# Altium PCB PCB1.PcbDoc
Units mm, origin at the board's own origin, x right, y up, seen from the top; angles counter-clockwise.
Board outline 16 x 23 mm, 2 copper layers (Top Layer, Bottom Layer); 6 components, 5 nets, 23 pads, 0 vias.
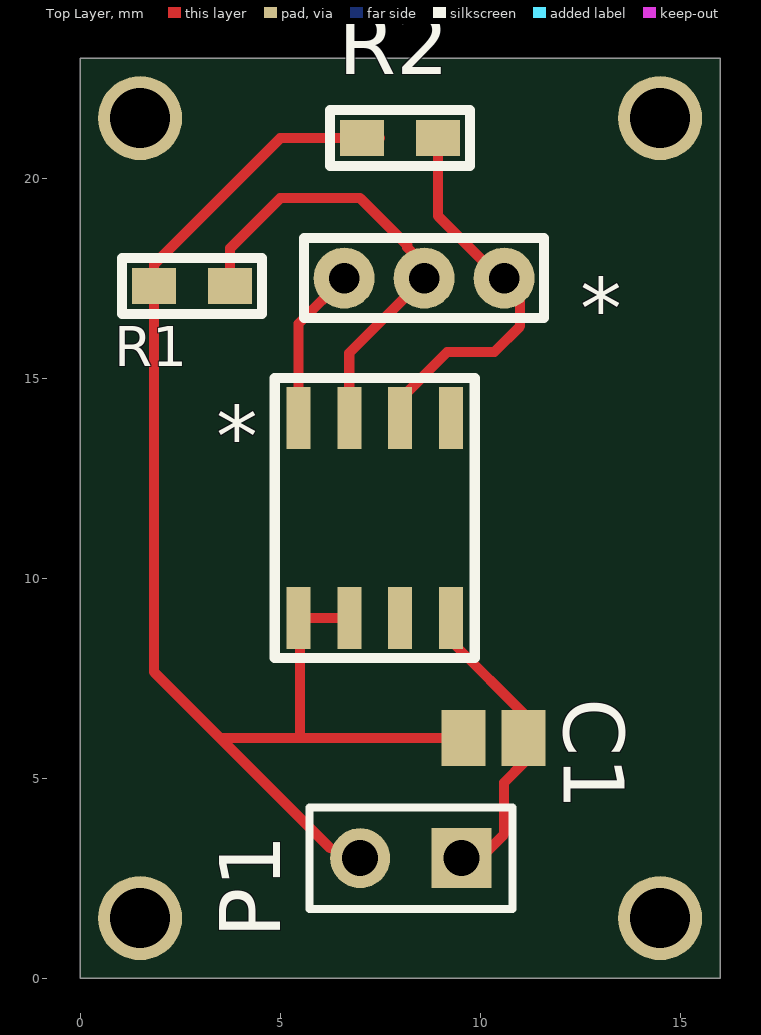
[diagram p0: Top Layer view]
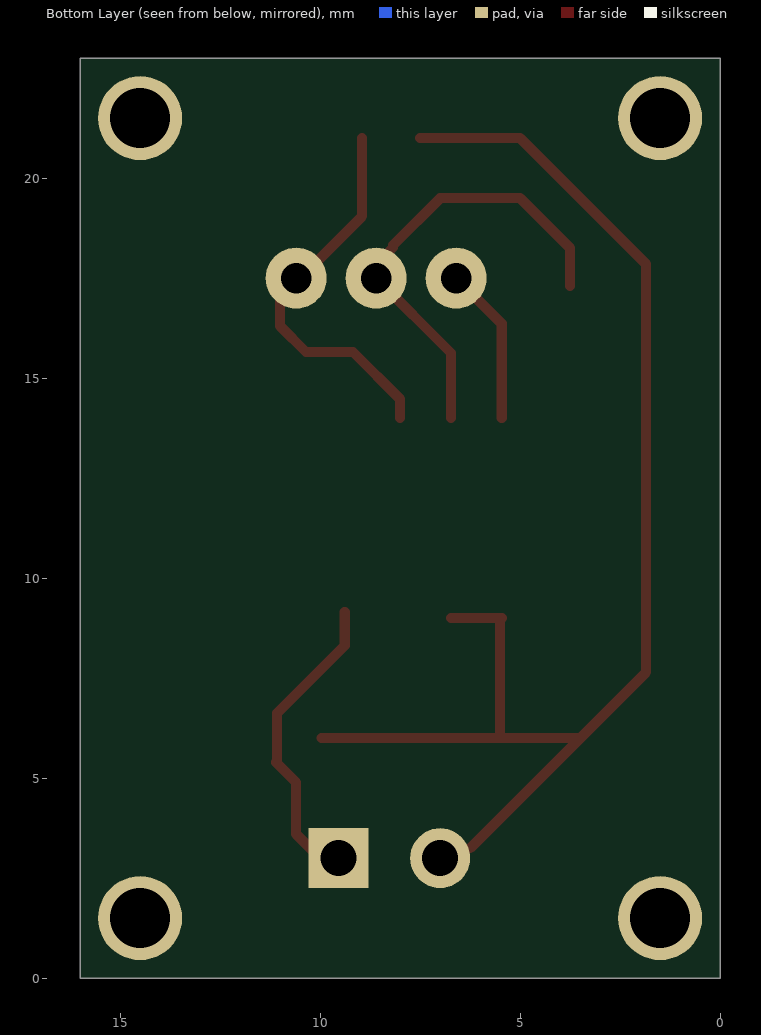
[diagram p1: Bottom Layer view, seen from below]

## Layer stack, top to bottom
Top Solder: solder mask 0.0102, Solder Resist, Dk 3.5
Top Layer: signal copper 0.0356
Dielectric 1: dielectric 0.32, FR-4, Dk 4.8
Bottom Layer: signal copper 0.0356
Bottom Solder: solder mask 0.0102, Solder Resist, Dk 3.5

## Board outline
0,0 0,23 16,23 16,0

## Design rules (kind name [scope] priority, off if disabled: settings)
Clearance [All] p1: gap=0.254 ignorepadtopadclearanceinfootprint=FALSE except(0: Arc-Hole Track-Hole SMDPad-Hole THPad-Hole Via-Hole Fill-Hole Poly-Hole Region-Hole Text-Hole; 0.3: Arc-Arc Arc-Track Track-Track)
PolygonConnect [All] p1: connectstyle=Relief reliefconductorwidth=0.254 reliefentries=4 polygonreliefangle="90 Angle" airgapwidth=0.254
RoutingVias [All] p1: holewidth=0.711 width=1.27 viastyle="Through Hole" minholewidth=0.711 minwidth=1.27 maxholewidth=0.711 maxwidth=1.27
SolderMaskExpansion [All] p1: expansion=0.102
Width [All] p1: maxlimit=1 minlimit=0.254 preferedwidth=0.254 bottomlayer_maxwidth=0.254 minimp=50.000000 maximp=50.000000 favimp=50.000000
30 further rules are at their usual default settings.

## Classes and differential pairs
component class Sheet1: * C1 P1 R1 R2

## Components (designator, comment, footprint, x,y, rotation, side; value= is the part's Value field where it differs from the comment)
* "AS5600" AS5600 5.46,9 r0 top
* "Connector 3H 2mm" "Connector 3H 2mm" 6.6,17.5 r0 top
C1 "Cap Pol3" C0805 10.335,6 r0 top value=100nF
P1 "Header 2" HDR1X2 9.54,3 r180 top
R1 "Res 2012" RES2012 2.8,17.3 r180 top
R2 "Res 2012" RES2012 8,21 r180 top

## Footprints (in the part's own frame and the unit in brackets; to place one, negate y for a bottom-side part, rotate by r counter-clockwise, add the part's x,y. Pads: shape width x height; smd on the part's side, far side on the other; paste and mask are expansions set on the pad)
AS5600 [mm]
  rect 0.6x1.55 smd: 1(0,0) 2(1.27,0) 3(2.54,0) 4(3.81,0) 5(0,5) 6(1.27,5) 7(2.54,5) 8(3.81,5)
  silkscreen extent -0.6,-1 4.41,6
C0805 [mm] "Chip Capacitor, Body 2.0x1.3mm, IPC High Density"
  rect 1.1x1.4 smd: 1(-0.75,0) 2(0.75,0)
  body extent -1.1,-0.72 1.1,0.72, height 1.4
"Connector 3H 2mm" [mil]
  round 60 hole 30: 1(0,0) 2(78.74,0) 3(157.48,0)
  silkscreen extent -39,-39 197,39
HDR1X2 [mm] "Connector; Header; 2 Position"
  rect 1.5x1.5 hole 0.9: 1(0,0)
  round 1.5 hole 0.9: 2(2.54,0)
  silkscreen extent -1.27,-1.27 3.81,1.27
RES2012 [mm]
  rect 1.1x0.9 smd: 1(-0.95,0) 2(0.95,0)
  silkscreen extent -1.75,-0.7 1.75,0.7

## Part data
C1: "Polarized Capacitor (Surface Mount)", LatestRevisionDate=29-May-2009, LatestRevisionNote="IPC-7351 Footprint Added.", PackageDescription="Chip Capacitor", PackageReference=C0805, Published=8-Jun-2000, Publisher="Altium Limited"
P1: "Header, 2-Pin", LatestRevisionDate=17-Jul-2002, LatestRevisionNote="Re-released for DXP Platform.", Publisher="Altium Limited"

## Free pads (board coordinates)
  round 2.1 hole 1.5: 1(1.5,21.5) 2(14.5,21.5) 3(1.5,1.5) 4(14.5,1.5)

## Nets (pads, with @x,y where several pads share a name; then routed paths per layer and width w, separated by ;. In a path a pad name is that pad's centre, name@x,y a point inside that pad or via, vN(x,y) a via of type N, cw(c..) or ccw(c..) an arc to the next point about the centre after c; other vN are vias at no path point)
+3.3V: *.1@5.46,9 *.2@6.73,9 C1.1 P1.2 R1.2 R2.2 | length 34.1
  Top Layer w0.254: 6.25,3.25 3.5,6 ; *.2@6.73,9 5.46,9 5.5,8.96 5.5,6 ; R2.2@7.5,21 R2.2 5,21 1.85,17.85 R1.2 1.85,7.651 3.5,6 ; C1.1@9.96,6 C1.1 5.5,6 ; 3.5,6 5.5,6
GND: *.4 C1.2 P1.1 | length 7.3
  Top Layer w0.254: *.4@9.385,9.155 9.385,8.315 11.08,6.62 11.08,6 11.08,5.42 11.105,5.395 10.6,4.89 10.6,3.6 P1.1@10,3
Net*_1: *.1@6.6,17.5 *.5 | length 4
  Top Layer w0.254: *.5 5.46,16.36 *.1@6.6,17.5
Net*_2: *.2@8.6,17.5 *.6 R1.1 | length 11.7
  Top Layer w0.254: R1.1 3.75,18.25 5,19.5 7,19.5 8.177,18.323 8.177,18.266 8.6,17.844 8.6,17.5 6.73,15.63 *.6
Net*_3: *.3@10.6,17.5 *.7 R2.1 | length 9.8
  Top Layer w0.254: *.7 8,14.475 9.177,15.652 10.353,15.652 11,16.3 11,17 10.55,17.45 8.95,19.05 R2.1
pads on no net: *.3@8,9 *.8

## Silkscreen, mask and mechanical layers (free items; w line width, h text height)
Mechanical 1:
  the board outline again, w0.254